# Altium PCB NB3000XN.PcbDoc (part 41 of 71)
Units mil, origin at the board's own origin, x right, y up, seen from the top; angles counter-clockwise.
Board outline 9527.56 x 6929.77 mil, 6 copper layers (Top Layer, GND+SHIELD, MidLayer1, MidLayer2, P2 - 3V3+5V0, Bottom Layer), stack 62.375 mil thick; 832 components, 1027 nets, 4655 pads, 4981 vias.
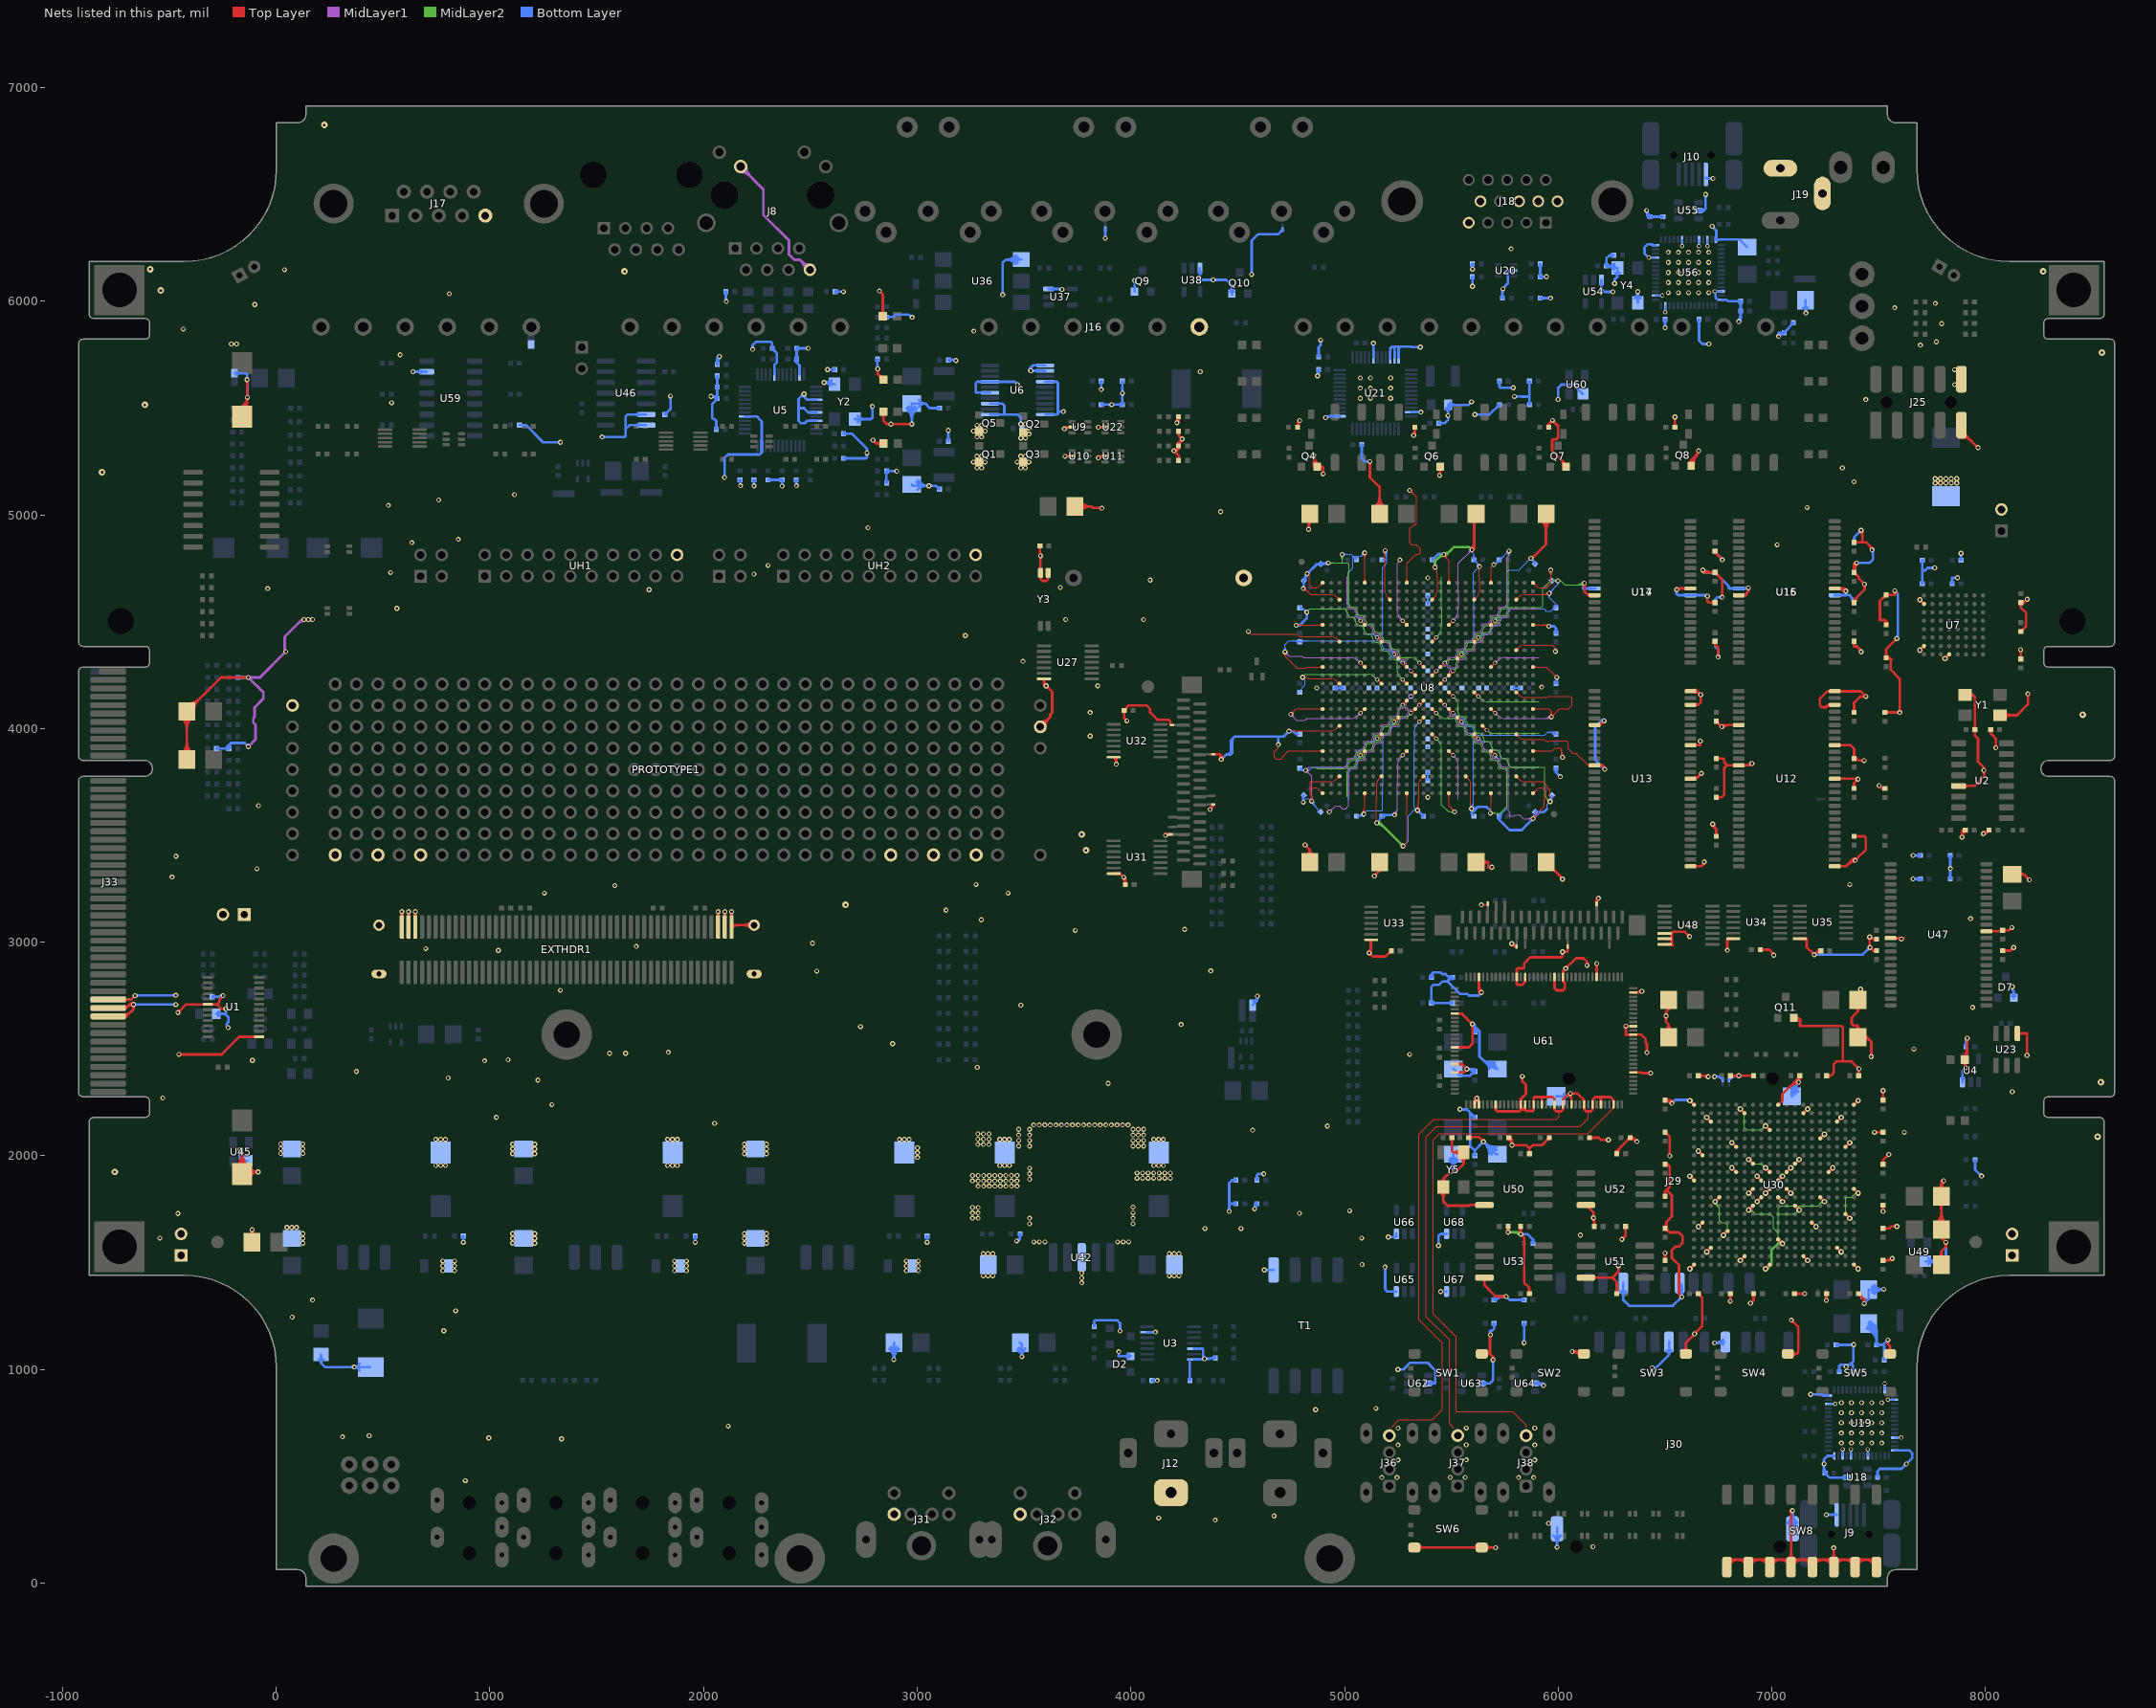
[diagram p45: the nets of this part, all layers, seen from the top]

## Via types
v1: diameter 23, hole 11.81, Top Layer to Bottom Layer, 3672 vias
v2: diameter 26, hole 11.81, Top Layer to Bottom Layer, 461 vias
v3: diameter 19, hole 11.81, Top Layer to Bottom Layer, tented both sides, 396 vias
v4: diameter 23.62, hole 11.81, Top Layer to Bottom Layer, 288 vias
v5: diameter 20, hole 11.81, Top Layer to Bottom Layer, 91 vias
v6: diameter 23, hole 11.81, Top Layer to Bottom Layer, tented both sides, 50 vias
v7: diameter 31, hole 11.81, Top Layer to Bottom Layer, 15 vias
v8: diameter 27.56, hole 11.81, Top Layer to Bottom Layer, tented both sides, 4 vias
v9: diameter 29, hole 11.81, Top Layer to Bottom Layer, 3 vias
v10: diameter 21, hole 11.81, Top Layer to Bottom Layer, 1 vias

## Nets (pads, with @x,y where several pads share a name; then routed paths per layer and width w, separated by ;. In a path a pad name is that pad's centre, name@x,y a point inside that pad or via, vN(x,y) a via of type N, cw(c..) or ccw(c..) an arc to the next point about the centre after c; other vN are vias at no path point) (continued)
GND: (continued)
  Top Layer w8: v2(6616.3,1471.3) U30.Y20@6635.98,1490.98 ; v2@6616.3,1480.3 ccw(c6616.3,1502.03) 6631.66,1486.66 ccw(c6647.03,1471.3) v2@6625.3,1471.3 ; v2@6616.3,1895.37 cw(c6616.3,1873.64) 6631.66,1889.01 cw(c6647.03,1904.37) v2@6625.3,1904.37 ; v2(6616.3,1904.37) U30.Y10@6635.98,1884.68 ; v2@6616.3,2249.7 cw(c6616.3,2227.97) 6631.66,2243.34 cw(c6647.03,2258.7) v2@6625.3,2258.7 ; v2(6616.3,2258.7) U30.Y1@6635.98,2239.02 ; U30.Y20@6630.14,1490.98 cw(c6616.04,1490.98) 6626.01,1481.01 cw(c6635.98,1471.04) U30.Y20@6635.98,1485.14 ; U30.Y10@6630.14,1884.68 ccw(c6616.04,1884.68) 6626.01,1894.66 ccw(c6635.98,1904.63) U30.Y10@6635.98,1890.53 ; U30.Y1@6630.14,2239.02 ccw(c6616.04,2239.02) 6626.01,2248.99 ccw(c6635.98,2258.96) U30.Y1@6635.98,2244.86 ; v2(6655.67,1668.15) U30.W15@6675.35,1687.83 ; v2@6655.67,1677.15 ccw(c6655.67,1698.88) 6671.03,1683.51 ccw(c6686.4,1668.15) v2@6664.67,1668.15 ; v2@6655.67,2013.48 cw(c6655.67,1991.75) 6671.03,2007.12 cw(c6686.4,2022.48) v2@6664.67,2022.48 ; v2(6655.67,2022.48) U30.W7@6675.35,2002.8 ; U30.W15@6669.51,1687.83 cw(c6655.41,1687.83) 6665.38,1677.86 cw(c6675.35,1667.89) U30.W15@6675.35,1681.99 ; U30.W7@6669.51,2002.8 ccw(c6655.41,2002.8) 6665.38,2012.77 ccw(c6675.35,2022.74) U30.W7@6675.35,2008.64 ; v2(6695.04,1550.04) U30.V18@6714.72,1569.72 ; v2@6695.04,1559.04 ccw(c6695.04,1580.77) 6710.4,1565.4 ccw(c6725.77,1550.04) v2@6704.04,1550.04 ; v2@6695.04,2170.96 cw(c6695.04,2149.23) 6710.4,2164.6 cw(c6725.77,2179.96) v2@6704.04,2179.96 ; v2(6695.04,2179.96) U30.V3@6714.72,2160.28 ; U30.V18@6708.88,1569.72 cw(c6694.78,1569.72) 6704.75,1559.75 cw(c6714.72,1549.78) U30.V18@6714.72,1563.88 ; U30.V3@6708.88,2160.28 ccw(c6694.78,2160.28) 6704.75,2170.25 ccw(c6714.72,2180.22) U30.V3@6714.72,2166.12 ; v2(6734.41,1786.26) U30.U12@6754.09,1805.94 ; v2@6734.41,1795.26 ccw(c6734.41,1816.99) 6749.77,1801.62 ccw(c6765.14,1786.26) v2@6743.41,1786.26 ; U30.U12@6748.25,1805.94 cw(c6734.15,1805.94) 6744.12,1795.97 cw(c6754.09,1786) U30.U12@6754.09,1800.1 ; v2(6773.78,1628.78) U30.T16@6793.46,1648.46 ; v2@6773.78,1637.78 ccw(c6773.78,1659.51) 6789.14,1644.14 ccw(c6804.51,1628.78) v2@6782.78,1628.78 ; U30.T16@6787.62,1648.46 cw(c6773.52,1648.46) 6783.49,1638.49 cw(c6793.46,1628.52) U30.T16@6793.46,1642.62 ; v2@6813.15,1934.74 cw(c6813.15,1913.01) 6828.51,1928.38 cw(c6843.88,1943.74) v2@6822.15,1943.74 ; v2(6813.15,1943.74) U30.R9@6832.83,1924.06 ; v2@6813.15,2052.85 cw(c6813.15,2031.12) 6828.51,2046.49 cw(c6843.88,2061.85) v2@6822.15,2061.85 ; v2(6813.15,2061.85) U30.R6@6832.83,2042.17 ; U30.R9@6826.99,1924.06 ccw(c6812.89,1924.06) 6822.86,1934.03 ccw(c6832.83,1944) U30.R9@6832.83,1929.9 ; U30.R6@6826.99,2042.17 ccw(c6812.89,2042.17) 6822.86,2052.14 ccw(c6832.83,2062.11) U30.R6@6832.83,2048.01 ; v2(6852.52,1510.67) U30.P19@6872.2,1530.35 ; v2@6852.52,1519.67 ccw(c6852.52,1541.4) 6867.88,1526.03 ccw(c6883.25,1510.67) v2@6861.52,1510.67 ; v2@6852.52,2210.33 cw(c6852.52,2188.6) 6867.88,2203.97 cw(c6883.25,2219.33) v2@6861.52,2219.33 ; v2(6852.52,2219.33) U30.P2@6872.2,2199.65 ; U30.P19@6866.36,1530.35 cw(c6852.26,1530.35) 6862.23,1520.38 cw(c6872.2,1510.41) U30.P19@6872.2,1524.51 ; U30.P2@6866.36,2199.65 ccw(c6852.26,2199.65) 6862.23,2209.62 ccw(c6872.2,2219.59) U30.P2@6872.2,2205.49 ; v2(6891.89,1746.89) U30.N13@6911.57,1766.57 ; v2@6891.89,1755.89 ccw(c6891.89,1777.62) 6907.25,1762.25 ccw(c6922.62,1746.89) v2@6900.89,1746.89 ; v2(6891.89,1825.63) U30.N11@6911.57,1845.31 ; v2@6891.89,1834.63 ccw(c6891.89,1856.36) 6907.25,1840.99 ccw(c6922.62,1825.63) v2@6900.89,1825.63 ; v2@6891.89,1974.11 cw(c6891.89,1952.38) 6907.25,1967.75 cw(c6922.62,1983.11) v2@6900.89,1983.11 ; v2(6891.89,1983.11) U30.N8@6911.57,1963.43 ; U30.N13@6905.73,1766.57 cw(c6891.63,1766.57) 6901.6,1756.6 cw(c6911.57,1746.63) U30.N13@6911.57,1760.73 ; U30.N11@6905.73,1845.31 cw(c6891.63,1845.31) 6901.6,1835.34 cw(c6911.57,1825.37) U30.N11@6911.57,1839.47 ; U30.N8@6905.73,1963.43 ccw(c6891.63,1963.43) 6901.6,1973.4 ccw(c6911.57,1983.37) U30.N8@6911.57,1969.27 ; v2(6931.26,1786.26) U30.M12@6950.94,1805.94 ; v2@6931.26,1795.26 ccw(c6931.26,1816.99) 6946.62,1801.62 ccw(c6961.99,1786.26) v2@6940.26,1786.26 ; v2@6931.26,1895.37 cw(c6931.26,1873.64) 6946.62,1889.01 cw(c6961.99,1904.37) v2@6940.26,1904.37 ; v2(6931.26,1904.37) U30.M10@6950.94,1884.68 ; U30.M12@6945.1,1805.94 cw(c6931,1805.94) 6940.97,1795.97 cw(c6950.94,1786) U30.M12@6950.94,1800.1 ; U30.M10@6945.1,1884.68 ccw(c6931,1884.68) 6940.97,1894.66 ccw(c6950.94,1904.63) U30.M10@6950.94,1890.53 ; v2(6970.63,1471.3) U30.L20@6990.31,1490.98 ; v2@6970.63,1480.3 ccw(c6970.63,1502.03) 6985.99,1486.66 ccw(c7001.36,1471.3) v2@6979.63,1471.3 ; v2(6970.63,1825.63) U30.L11@6990.31,1845.31 ; v2@6970.63,1834.63 ccw(c6970.63,1856.36) 6985.99,1840.99 ccw(c7001.36,1825.63) v2@6979.63,1825.63 ; v2@6970.63,1934.74 cw(c6970.63,1913.01) 6985.99,1928.38 cw(c7001.36,1943.74) v2@6979.63,1943.74 ; v2(6970.63,1943.74) U30.L9@6990.31,1924.06 ; v2@6970.63,2131.59 cw(c6970.63,2109.86) 6985.99,2125.23 cw(c7001.36,2140.59) v2@6979.63,2140.59 ; v2(6970.63,2140.59) U30.L4@6990.31,2120.91 ; U30.L20@6984.47,1490.98 cw(c6970.37,1490.98) 6980.34,1481.01 cw(c6990.31,1471.04) U30.L20@6990.31,1485.14 ; U30.L11@6984.47,1845.31 cw(c6970.37,1845.31) 6980.34,1835.34 cw(c6990.31,1825.37) U30.L11@6990.31,1839.47 ; U30.L9@6984.47,1924.06 ccw(c6970.37,1924.06) 6980.34,1934.03 ccw(c6990.31,1944) U30.L9@6990.31,1929.9 ; U30.L4@6984.47,2120.91 ccw(c6970.37,2120.91) 6980.34,2130.88 ccw(c6990.31,2140.85) U30.L4@6990.31,2126.75 ; U30.K17@7029.69,1603.25 cw(c7029.69,1589.15) 7039.66,1599.12 cw(c7049.63,1609.09) U30.K17@7035.53,1609.09 ; U30.K17@7029.69,1609.09 v2(7049.37,1589.41) ; U30.K12@7029.69,1800.1 cw(c7029.69,1786) 7039.66,1795.97 cw(c7049.63,1805.94) U30.K12@7035.53,1805.94 ; U30.K12@7029.69,1805.94 v2(7049.37,1786.26) ; U30.K10@7029.69,1884.68 v2(7049.37,1904.37) ; U30.K10@7029.69,1890.53 ccw(c7029.69,1904.63) 7039.66,1894.66 ccw(c7049.63,1884.68) U30.K10@7035.53,1884.68 ; U30.K1@7029.69,2239.02 7049.37,2258.7 ; U30.K1@7029.69,2244.86 ccw(c7029.69,2258.96) 7039.66,2248.99 ccw(c7049.63,2239.02) U30.K1@7035.53,2239.02 ; v2@7040.37,1589.41 ccw(c7018.64,1589.41) 7034.01,1604.77 ccw(c7049.37,1620.14) v2@7049.37,1598.41 ; v2@7040.37,1786.26 ccw(c7018.64,1786.26) 7034.01,1801.62 ccw(c7049.37,1816.99) v2@7049.37,1795.26 ; v2@7040.37,1904.37 cw(c7018.64,1904.37) 7034.01,1889.01 cw(c7049.37,1873.64) v2@7049.37,1895.37 ; U30.J11@7069.06,1839.47 cw(c7069.06,1825.37) 7079.03,1835.34 cw(c7089,1845.31) U30.J11@7074.9,1845.31 ; U30.J11@7069.06,1845.31 v2(7088.74,1825.63) ; U30.J9@7069.06,1924.06 v2(7088.74,1943.74) ; U30.J9@7069.06,1929.9 ccw(c7069.06,1944) 7079.03,1934.03 ccw(c7089,1924.06) U30.J9@7074.9,1924.06 ; v2@7079.74,1825.63 ccw(c7058.01,1825.63) 7073.38,1840.99 ccw(c7088.74,1856.36) v2@7088.74,1834.63 ; v2@7079.74,1943.74 cw(c7058.01,1943.74) 7073.38,1928.38 cw(c7088.74,1913.01) v2@7088.74,1934.74 ; U30.H13@7108.43,1760.73 cw(c7108.43,1746.63) 7118.4,1756.6 cw(c7128.37,1766.57) U30.H13@7114.27,1766.57 ; U30.H13@7108.43,1766.57 v2(7128.11,1746.89) ; U30.H8@7108.43,1963.43 v2(7128.11,1983.11) ; U30.H8@7108.43,1969.27 ccw(c7108.43,1983.37) 7118.4,1973.4 ccw(c7128.37,1963.43) U30.H8@7114.27,1963.43 ; v2@7119.11,1746.89 ccw(c7097.38,1746.89) 7112.75,1762.25 ccw(c7128.11,1777.62) v2@7128.11,1755.89 ; v2@7119.11,1983.11 cw(c7097.38,1983.11) 7112.75,1967.75 cw(c7128.11,1952.38) v2@7128.11,1974.11 ; U30.G19@7147.8,1524.51 cw(c7147.8,1510.41) 7157.77,1520.38 cw(c7167.74,1530.35) U30.G19@7153.64,1530.35 ; U30.G19@7147.8,1530.35 v2(7167.48,1510.67) ; U30.G2@7147.8,2199.65 v2(7167.48,2219.33) ; U30.G2@7147.8,2205.49 ccw(c7147.8,2219.59) 7157.77,2209.62 ccw(c7167.74,2199.65) U30.G2@7153.64,2199.65 ; v2@7158.48,1510.67 ccw(c7136.75,1510.67) 7152.12,1526.03 ccw(c7167.48,1541.4) v2@7167.48,1519.67 ; v2@7158.48,2219.33 cw(c7136.75,2219.33) 7152.12,2203.97 cw(c7167.48,2188.6) v2@7167.48,2210.33 ; U30.F15@7187.17,1681.99 cw(c7187.17,1667.89) 7197.14,1677.86 cw(c7207.11,1687.83) U30.F15@7193.01,1687.83 ; U30.F15@7187.17,1687.83 v2(7206.85,1668.15) ; v2@7197.85,1668.15 ccw(c7176.12,1668.15) 7191.49,1683.51 ccw(c7206.85,1698.88) v2@7206.85,1677.15 ; U30.E12@7226.54,1800.1 cw(c7226.54,1786) 7236.51,1795.97 cw(c7246.48,1805.94) U30.E12@7232.38,1805.94 ; U30.E12@7226.54,1805.94 v2(7246.22,1786.26) ; U30.E5@7226.54,2081.54 v2(7246.22,2101.22) ; U30.E5@7226.54,2087.38 ccw(c7226.54,2101.48) 7236.51,2091.51 ccw(c7246.48,2081.54) U30.E5@7232.38,2081.54 ; v2@7237.22,1786.26 ccw(c7215.49,1786.26) 7230.86,1801.62 ccw(c7246.22,1816.99) v2@7246.22,1795.26 ; v2@7237.22,2101.22 cw(c7215.49,2101.22) 7230.86,2085.86 cw(c7246.22,2070.49) v2@7246.22,2092.22 ; U30.D9@7265.91,1924.06 v2(7285.59,1943.74) ; U30.D9@7265.91,1929.9 ccw(c7265.91,1944) 7275.88,1934.03 ccw(c7285.85,1924.06) U30.D9@7271.75,1924.06 ; v2@7276.59,1943.74 cw(c7254.86,1943.74) 7270.23,1928.38 cw(c7285.59,1913.01) v2@7285.59,1934.74 ; U30.C18@7305.28,1563.88 cw(c7305.28,1549.78) 7315.25,1559.75 cw(c7325.22,1569.72) U30.C18@7311.12,1569.72 ; U30.C18@7305.28,1569.72 v2(7324.96,1550.04) ; U30.C3@7305.28,2160.28 v2(7324.96,2179.96) ; U30.C3@7305.28,2166.12 ccw(c7305.28,2180.22) 7315.25,2170.25 ccw(c7325.22,2160.28) U30.C3@7311.12,2160.28 ; v2@7315.96,1550.04 ccw(c7294.23,1550.04) 7309.6,1565.4 ccw(c7324.96,1580.77) v2@7324.96,1559.04 ; v2@7315.96,2179.96 cw(c7294.23,2179.96) 7309.6,2164.6 cw(c7324.96,2149.23) v2@7324.96,2170.96 ; U30.B14@7344.65,1721.36 cw(c7344.65,1707.26) 7354.62,1717.23 cw(c7364.59,1727.2) U30.B14@7350.49,1727.2 ; U30.B14@7344.65,1727.2 v2(7364.33,1707.52) ; U30.B6@7344.65,2042.17 v2(7364.33,2061.85) ; U30.B6@7344.65,2048.01 ccw(c7344.65,2062.11) 7354.62,2052.14 ccw(c7364.59,2042.17) U30.B6@7350.49,2042.17 ; v2@7355.33,1707.52 ccw(c7333.6,1707.52) 7348.97,1722.88 ccw(c7364.33,1738.25) v2@7364.33,1716.52 ; v2@7355.33,2061.85 cw(c7333.6,2061.85) 7348.97,2046.49 cw(c7364.33,2031.12) v2@7364.33,2052.85 ; U30.A20@7384.02,1485.14 cw(c7384.02,1471.04) 7393.99,1481.01 cw(c7403.96,1490.98) U30.A20@7389.86,1490.98 ; U30.A20@7384.02,1490.98 v2(7403.7,1471.3) ; U30.A11@7384.02,1839.47 cw(c7384.02,1825.37) 7393.99,1835.34 cw(c7403.96,1845.31) U30.A11@7389.86,1845.31 ; U30.A11@7384.02,1845.31 v2(7403.7,1825.63) ; U30.A1@7384.02,2239.02 v2(7403.7,2258.7) ; U30.A1@7384.02,2244.86 ccw(c7384.02,2258.96) 7393.99,2248.99 ccw(c7403.96,2239.02) U30.A1@7389.86,2239.02 ; v2@7394.7,1471.3 ccw(c7372.97,1471.3) 7388.34,1486.66 ccw(c7403.7,1502.03) v2@7403.7,1480.3 ; v2@7394.7,1825.63 ccw(c7372.97,1825.63) 7388.34,1840.99 ccw(c7403.7,1856.36) v2@7403.7,1834.63 ; v2@7394.7,2258.7 cw(c7372.97,2258.7) 7388.34,2243.34 cw(c7403.7,2227.97) v2@7403.7,2249.7 ; v2(7692.52,4366.89) U7.H7@7712.2,4386.57 ; v2@7692.52,4375.89 ccw(c7692.52,4397.62) 7707.88,4382.25 ccw(c7723.25,4366.89) v2@7701.52,4366.89 ; v2@7692.52,4594.11 cw(c7692.52,4572.38) 7707.88,4587.75 cw(c7723.25,4603.11) v2@7701.52,4603.11 ; v2(7692.52,4603.11) U7.H2@7712.2,4583.43 ; U7.H7@7706.2,4386.57 cw(c7691.72,4386.57) 7701.96,4376.33 cw(c7712.2,4366.09) U7.H7@7712.2,4380.57 ; U7.H2@7706.2,4583.43 ccw(c7691.72,4583.43) 7701.96,4593.67 ccw(c7712.2,4603.91) U7.H2@7712.2,4589.43 ; v2(7810.63,4327.52) U7.E8@7830.32,4347.2 ; v2@7810.63,4336.52 ccw(c7810.63,4358.25) 7825.99,4342.88 ccw(c7841.36,4327.52) v2@7819.63,4327.52 ; U7.E8@7824.32,4347.2 cw(c7809.83,4347.2) 7820.07,4336.96 cw(c7830.32,4326.72) U7.E8@7830.32,4341.2
  Top Layer w11.81: v1@7539.57,1134.42 cw(c7530.02,1124.87) 7543.52,1124.87 cw(c7557.03,1124.87) v1@7547.48,1134.42 ; SW5.3@7541.89,1085.62 ccw(c7520.35,1110) 7552.87,1110 ccw(c7585.4,1110) SW5.3@7563.86,1085.62 ; v1(7543.52,1138.37) 7543.52,1119.35 7552.87,1110 SW5.3@7552.87,1073.19